# Altium PCB x-IMU3-SA-Sync.PcbDoc
Units mm, origin at the board's own origin, x right, y up, seen from the top; angles counter-clockwise.
Board outline 14 x 12 mm, 2 copper layers (Top Layer, Bottom Layer), stack 1.569 mm thick; 7 components, 6 nets, 22 pads, 30 vias.
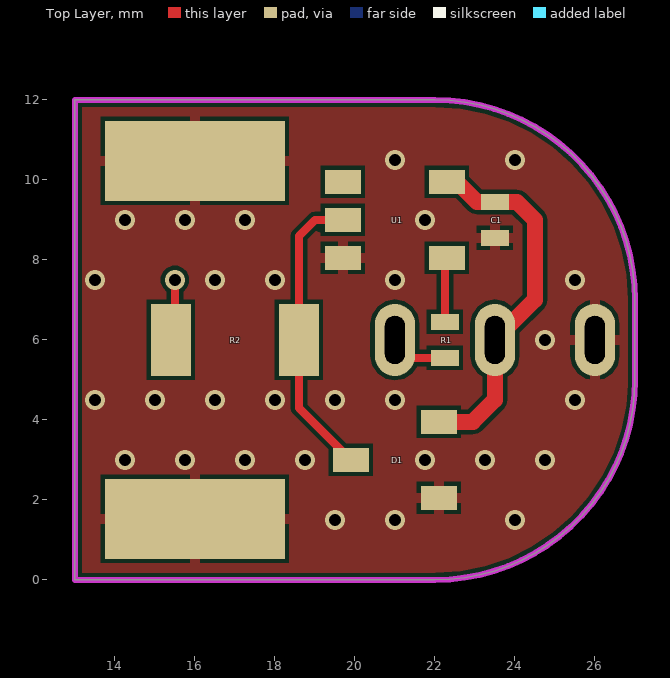
[diagram p0: Top Layer view]
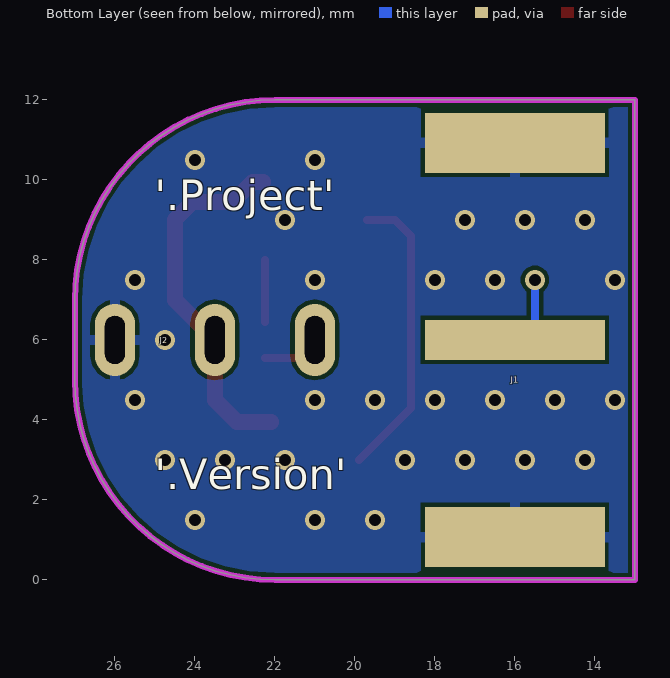
[diagram p1: Bottom Layer view, seen from below]

## Layer stack, top to bottom
Top Solder: solder mask 0.0254, SM-001, Dk 4
Top Layer: signal copper 0.035
Dielectric 1: core 1.4986, Core-043, Dk 4.3
Bottom Layer: signal copper 0.035
Bottom Solder: solder mask 0.0254, SM-001, Dk 4

## Board outline
13,0 13,12 22,12 cw(c22,7) 27,7 27,5 cw(c22,5) 22,0

## Design rules (kind name [scope] priority, off if disabled: settings)
Clearance [All] p1: gap=0.1 ignorepadtopadclearanceinfootprint=FALSE except(0: Arc-Hole Track-Hole SMDPad-Hole THPad-Hole Via-Hole Fill-Hole Poly-Hole Region-Hole Text-Hole)
DiffPairsRouting [All] p1: maxlimit=0.254 minlimit=0.1 mostfreqgap=0.1 toplayer_minwidth=0.1 toplayer_maxwidth=0.381 toplayer_prefwidth=0.1 bottomlayer_minwidth=0.1 bottomlayer_maxwidth=0.381 bottomlayer_prefwidth=0.1 maxuncoupledlength=12.7
HoleSize [All] p1: absolutevalues=TRUE maxlimit=10 minlimit=0.025 maxpercent=80.000 minpercent=20.000
MatchedLengths [All] p1: tolerance=0.1 checknetsindiffpair=TRUE checkdiffpairvsdiffpair=FALSE checkxsignals=FALSE checkothers=FALSE
MinimumSolderMaskSliver [All] p1: minsoldermaskwidth=0
PlaneClearance [All] p1: clearance=0.2
PlaneConnect [All] p1: planeconnectstyle=Direct reliefexpansion=0.508 reliefentries=4 reliefconductorwidth=0.254 reliefairgap=0.254
PolygonConnect [All] p1: thpad.connectstyle=Relief thpad.reliefconductorwidth=0.254 thpad.reliefentries=4 thpad.polygonreliefangle="90 Angle" thpad.airgapwidth=0.1 smdpad.connectstyle=Relief smdpad.reliefconductorwidth=0.254 smdpad.reliefentries=4 smdpad.polygonreliefangle="90 Angle" smdpad.airgapwidth=0.1 via.connectstyle=Direct via.reliefconductorwidth=0.254 via.reliefentries=4 via.polygonreliefangle="90 Angle" via.airgapwidth=0.254
RoutingVias [All] p1: holewidth=0.711 width=1.27 viastyle="Through Hole" minholewidth=0.15 minwidth=0.35 maxholewidth=0.711 maxwidth=1.27
SilkToSolderMaskClearance [IsPad] p1: minsilkscreentomaskgap=0.1 clearancetoexposedcopper=TRUE
SolderMaskExpansion [All] p1: expansion=0.102 istentingtop=FALSE
SupplyNets "Schematic Supply Nets_2" [InNet('VDD')] p1: voltage=0.000
SupplyNets "Schematic Supply Nets_1" [InNet('GND')] p2: voltage=0.000
Width [All] p1: maxlimit=1 minlimit=0.05 preferedwidth=0.1
24 further rules are at their usual default settings.

## Components (designator, comment, footprint, x,y, rotation, side; value= is the part's Value field where it differs from the comment)
C1 "100nF" "Capacitor 0402" 23.5,9 r90 top
D1 "BAT54S" SOT-23 21,3 r270 top
J1 "Amphenol 112640" "AMPHENOL 112640" 13,6 r90 bottom
J2 "SP-3533-02" SP-3533-02 23.5,6 r180 bottom
R1 "470R" "Resistor 0402" 22.25,6 r270 top
R2 "1kR, 250mW" "Resistor 1206" 17,6 r0 top
U1 "SN74LVC1G17DBV" SOT-23-5 21,9 r270 top

## Footprints (in the part's own frame and the unit in brackets; to place one, negate y for a bottom-side part, rotate by r counter-clockwise, add the part's x,y. Pads: shape width x height; smd on the part's side, far side on the other; paste and mask are expansions set on the pad)
"AMPHENOL 112640" [mm]
  rect 1.5x4.5 smd: Shield(-4.925,3) Shield(4.925,3)
  rect 2x4.5 smd far side: Shield(-4.475,3) Shield(4.475,3)
  rect 1x4.5 smd: Signal(0,3)
  body extent -5.5,-12.47 5.5,4.5, height 5.9
"Capacitor 0402" [mm]
  rect 0.4x0.7 smd: 1(-0.45,0) 2(0.45,0)
  body extent -0.5,-0.25 0.5,0.25, height 0.48
"Resistor 0402" [mm]
  rect 0.4x0.7 smd: 1(-0.45,0) 2(0.45,0)
  body extent -0.5,-0.25 0.5,0.25, height 0.34
"Resistor 1206" [mm]
  rect 1x1.8 smd: 1(-1.6,0) 2(1.6,0)
  body extent -1.6,-0.8 1.6,0.8, height 0.62
SOT-23 [mm]
  rect 0.6x0.9 smd: 1(0.95,1.1) 2(-0.95,1.1) 3(0,-1.1)
  body extent -1.5,-1.25 1.5,1.25, height 1.06
SOT-23-5 [mm]
  rect 0.6x0.9 smd: 1(-0.95,-1.3) 2(0,-1.3) 3(0.95,-1.3) 4(0.95,1.3) 5(-0.95,1.3)
  body extent -1.45,-1.41 1.45,1.41, height 1.45
SP-3533-02 [mm]
  oval 1x1.8 hole 0.5 slot 1.2 at 90 deg: R(0,0) S(-2.5,0) T(2.5,0)
  body extent -21.85,-2.5 4.75,2.5, height 5

## Part data
C1: library part Capacitor
J1: library part BNC
R1 R2: library part Resistor
U1: library part "SN74LVC1xxx (1 Input)"

## Via types
v1: diameter 0.5, hole 0.3, Top Layer to Bottom Layer, tented both sides, 30 vias

## Nets (pads, with @x,y where several pads share a name; then routed paths per layer and width w, separated by ;. In a path a pad name is that pad's centre, name@x,y a point inside that pad or via, vN(x,y) a via of type N, cw(c..) or ccw(c..) an arc to the next point about the centre after c; other vN are vias at no path point)
GND: C1.1 D1.1 J1.Shield J2.S U1.3
  other v1: 19.5,1.5 21,1.5 24,1.5 14.25,3 15.75,3 17.25,3 18.75,3 21.75,3 23.25,3 24.75,3 13.5,4.5 15,4.5 16.5,4.5 18,4.5 19.5,4.5 21,4.5 25.5,4.5 24.75,6 13.5,7.5 16.5,7.5 18,7.5 21,7.5 25.5,7.5 14.25,9 15.75,9 17.25,9 21.75,9 21,10.5 24,10.5
Input: D1.3 R2.2 U1.2 | length 7.4
  Top Layer w0.2: U1.2 19,9 18.6,8.6 R2.2 18.6,4.3 D1.3
"Input R": J1.Signal R2.1 | length 2.4
  Top Layer w0.2: R2.1@15.5,6.1 v1(15.5,7.5)
  Bottom Layer w0.2: 15.5,6.5 v1(15.5,7.5)
Output: R1.1 U1.4 | length 1.5
  Top Layer w0.2: R1.1 U1.4@22.25,8
"Output R": J2.T R1.2 | length 1.4
  Top Layer w0.2: J2.T 21.45,5.55 R1.2
VDD: C1.2 D1.2 J2.R U1.5 | length 9.1
  Top Layer w0.4: D1.2 22.95,3.95 23.5,4.5 J2.R 24.5,7 24.5,9 24.05,9.45 C1.2 23.05,9.45 22.55,9.95 U1.5
pads on no net: U1.1

## Polygon pours and split planes (outlines as drawn)
GND on Bottom Layer "GND_L02_P000" (solid, remove dead copper, pour order 0): 13,0 13,12 27,12 27,0
GND on Top Layer "GND_L01_P001" (solid, remove dead copper, pour order 1): 13,0 13,12 27,12 27,0

## Keep-outs
Keep-Out Layer:
  the board outline again, w0.15

## Silkscreen, mask and mechanical layers (free items; w line width, h text height)
Bottom Overlay:
  text "'.Project'" at 25,8.994 h1.3
  text "'.Version'" at 25,2.014 h1.3